# Altium PCB PCI Express Mini L1.PCBDOC (part 3 of 7)
Units mm, origin at the board's own origin, x right, y up, seen from the top; angles counter-clockwise.
Board outline 70 x 83.2 mm, 6 copper layers (TopLayer, Layer 1, Layer 2, Layer 3, Layer 4, Bottom Layer), stack 0.914 mm thick; 402 components, 242 nets, 1301 pads, 522 vias.
Unrouted connection lines stored in the file: 225.
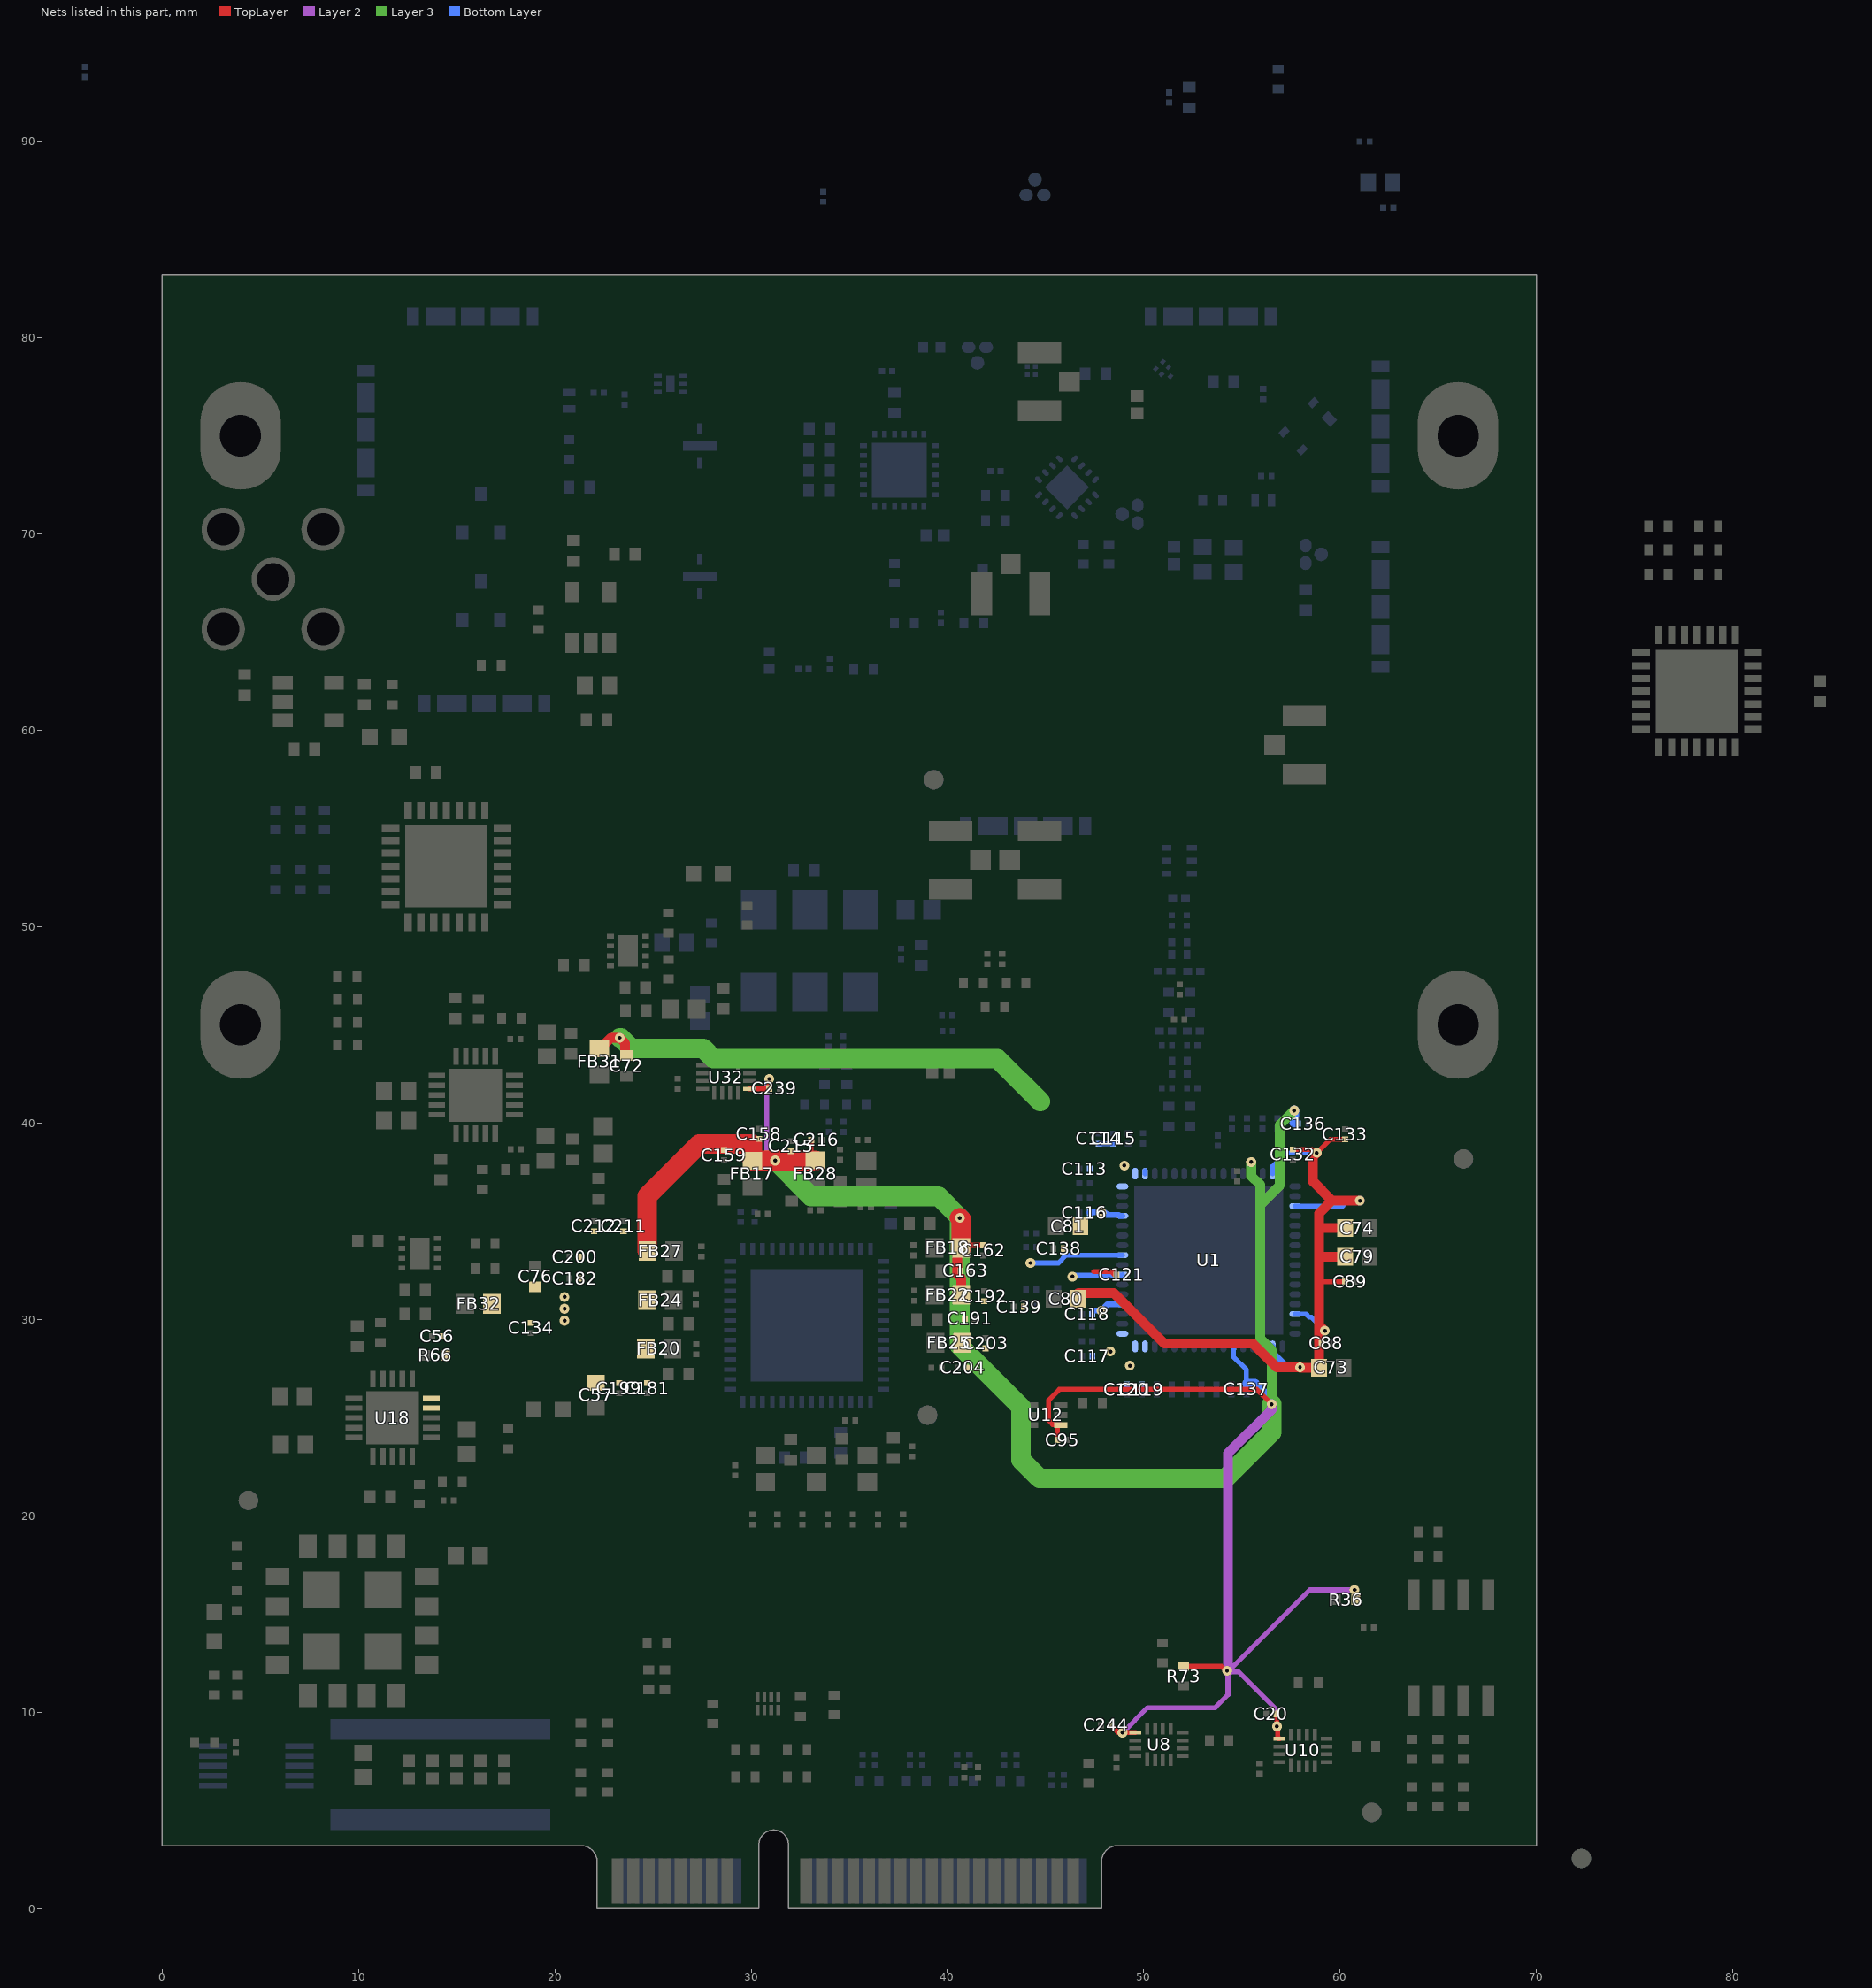
[diagram p6: the nets of this part, all layers, seen from the top]

## Part data (continued)
D2: "Diode PIN 180V 1500mA 3-Pin QFN EP T/R", Case/Package=QFN, Manufacturer="Skyworks Solutions", Max Current Rating=1.5A, Max Power Dissipation=2W, Supplier Part Number 1=863-1780-1-ND, Category=Diodes, ComponentLink1Description=http://www.mouser.com/ds/2/472/CLA4611_085LF_203346B-1079479.pdf?src-supplier=Mouser, ComponentLink1URL=http://www.mouser.com/ds/2/472/CLA4611_085LF_203346B-1079479.pdf?src-supplier=Mouser, ComponentLink2Description=http://www.skyworksinc.com/uploads/documents/CLA4611_085LF_203346B.pdf?src-supplier=Digi-Key, ComponentLink2URL=http://www.skyworksinc.com/uploads/documents/CLA4611_085LF_203346B.pdf?src-supplier=Digi-Key, Diode Type="PIN - Single", Manufacturer Part Number=CLA4611-085LF, Packaging="Tape and Reel", Pricing 1="1=2,06000, 10=1,85200, 25=1,74760, 100=1,48890, 250=1,39800, 500=1,22326, 1000=1,01355 (USD)", RoHS=Yes, Stock 1=1259, Supplier 1=Digi-Key
D3 D4 D7 D8: "LED,  LTST-C190GKT", Case Code (Imperial)=0603, Case Code (Metric)=1608, Color=Green, Forward Current=30mA, Forward Voltage=2.1V, Lens Color=Colorless, Manufacturer 1="Vishay Lite-On", Max Operating Temperature=85°C, Min Operating Temperature=-55°C, Package Quantity=1, Power Dissipation=100mW, Reverse Voltage=5V, Supplier Part Number 1=160-1183-1-ND, Test Current=10mA, Voltage=2V, Case/Package=0603, ComponentLink1Description=https://datasheet.ciiva.com/11775/0900766b80dc02a6-11775616.pdf?src-supplier=RSComponents, ComponentLink1URL=https://datasheet.ciiva.com/11775/0900766b80dc02a6-11775616.pdf?src-supplier=RSComponents, ComponentLink2Description=https://datasheet.ciiva.com/2109/ltst-c190gkt-2109985.pdf?src-supplier=Digi-Key, ComponentLink2URL=https://datasheet.ciiva.com/2109/ltst-c190gkt-2109985.pdf?src-supplier=Digi-Key, ComponentLink3Description=https://datasheet.ciiva.com/16392/lite-on20ltst-c190gkt-16392818.pdf?src-supplier=Future+Electronics, ComponentLink3URL=https://datasheet.ciiva.com/16392/lite-on20ltst-c190gkt-16392818.pdf?src-supplier=Future+Electronics, ComponentLink4Description=https://datasheet.ciiva.com/12403/lite-on-ltst-c190gkt-187204-12403884.pdf?src-supplier=Mouser, ComponentLink4URL=https://datasheet.ciiva.com/12403/lite-on-ltst-c190gkt-187204-12403884.pdf?src-supplier=Mouser, ComponentLink5Description=https://datasheet.ciiva.com/2109/ltst-c190gkt-2109986.pdf?src-supplier=Digi-Key, ComponentLink5URL=https://datasheet.ciiva.com/2109/ltst-c190gkt-2109986.pdf?src-supplier=Digi-Key, ComponentLink6Description=https://datasheet.ciiva.com/2109/ltst-c190gkt-2109987.pdf?src-supplier=Digi-Key, ComponentLink6URL=https://datasheet.ciiva.com/2109/ltst-c190gkt-2109987.pdf?src-supplier=Digi-Key, Depth=0.8mm, Dominant Wavelength=569nm, Height=0.8mm, Illumination Color=Green, Lead Free="Lead Free", Length=1.6mm, Lens Style=Clear,Diffused,Colorless,Rectangular, Lens Transparency=Clear, Luminous Intensity=6mcd, Manufacturer Part Number 1=LTST-C190GKT, Mount="Surface Mount", Number of Elements=1, Number of LEDs=1, Number of Pins=2, Packaging="Tape and Reel", Power Rating=100mW, Pricing 1="1=0.26000, 10=0.18800, 100=0.08880, 500=0.05922, 1000=0.04639 (USD)", Radiation Hardening=No, RoHS=Yes, Stock 1=908158, Supplier 1=Digi-Key, Viewing Angle=130°, Wavelength=565nm, Width=0.8mm
D5: "DIODE RF PIN 45V 1.5A 3QFN", Case/Package=QFN, Forward Current=1.5A, Manufacturer="Skyworks Solutions", Max Operating Temperature=150°C, Max Power Dissipation=2W, Min Operating Temperature=-40°C, Package Quantity=3000, Power Dissipation=30W, Reverse Voltage (DC)=45V, Supplier Part Number 1=863-1400-1-ND, Category=Diodes, ComponentLink1Description=https://datasheet.ciiva.com/15224/getdatasheetpartid-729048-15224693.pdf?src-supplier=Verical, ComponentLink1URL=https://datasheet.ciiva.com/15224/getdatasheetpartid-729048-15224693.pdf?src-supplier=Verical, Diode Type="PIN - Single", Element Configuration="Common Anode", Lead Free="Lead Free", Manufacturer Part Number=CLA4603-085LF, Max Current Rating=1.5A, Mount="Surface Mount", Number of Pins=3, Packaging="Tape and Reel", Pricing 1="1=2,06000, 10=1,85200, 25=1,74760, 100=1,48890, 250=1,39800, 500=1,22326, 1000=1,01355 (USD)", Radiation Hardening=No, RoHS=Yes, Stock 1=32861, Supplier 1=Digi-Key, Termination=SMD/SMT
FB1 FB2 FB3: library part Ferrite, Case Code (Imperial)=0402, Case Code (Metric)=1005, Current Rating=300mA, DC Resistance (DCR)=550mR, Frequency=100MHz, Manufacturer 1=Murata, Manufacturer Part Number 1=BLM15BB121SN1D, Max Operating Temperature=125°C, Min Operating Temperature=-55°C, Package Quantity=1, Supplier Part Number 1=490-1008-1-ND, Tolerance=25%, Case/Package=0402, ComponentLink1Description=https://datasheet.ciiva.com/1466/5145-1466832.pdf?src-supplier=Element14, ComponentLink1URL=https://datasheet.ciiva.com/1466/5145-1466832.pdf?src-supplier=Element14, ComponentLink2Description=https://datasheet.ciiva.com/41449/001172179-da-01-en-drossel-0402-120r-1-0x0-5mm-10000st-41449466.pdf?src-supplier=Conrad, ComponentLink2URL=https://datasheet.ciiva.com/41449/001172179-da-01-en-drossel-0402-120r-1-0x0-5mm-10000st-41449466.pdf?src-supplier=Conrad, ComponentLink3Description=https://datasheet.ciiva.com/1466/5145-1466833.pdf?src-supplier=Element14, ComponentLink3URL=https://datasheet.ciiva.com/1466/5145-1466833.pdf?src-supplier=Element14, ComponentLink4Description=https://datasheet.ciiva.com/3082/l0110s0100blm15b-3082680.pdf?src-supplier=Avnet, ComponentLink4URL=https://datasheet.ciiva.com/3082/l0110s0100blm15b-3082680.pdf?src-supplier=Avnet, ComponentLink5Description=https://datasheet.ciiva.com/16213/l0110s0100blm15b-16213674.pdf?src-supplier=Future+Electronics, ComponentLink5URL=https://datasheet.ciiva.com/16213/l0110s0100blm15b-16213674.pdf?src-supplier=Future+Electronics, ComponentLink6Description=https://datasheet.ciiva.com/1012/l0110s0100blm15b-1012029.pdf?src-supplier=Digi-Key, ComponentLink6URL=https://datasheet.ciiva.com/1012/l0110s0100blm15b-1012029.pdf?src-supplier=Digi-Key, ComponentLink7Description=https://datasheet.ciiva.com/1012/l0110s0100blm15b-1012030.pdf?src-supplier=Digi-Key, ComponentLink7URL=https://datasheet.ciiva.com/1012/l0110s0100blm15b-1012030.pdf?src-supplier=Digi-Key, ComponentLink8Description=https://datasheet.ciiva.com/1012/l0110s0100blm15b-1012031.pdf?src-supplier=Digi-Key, ComponentLink8URL=https://datasheet.ciiva.com/1012/l0110s0100blm15b-1012031.pdf?src-supplier=Digi-Key, Composition="Ferrite Bead", Core Material=Ferrite, Depth=0.5mm, Height=0.5mm, Impedance=120R, Lead Free="Lead Free", Length=1mm, Material=Ferrite,Steel, Max Current Rating=300mA, Max DC Current=300mA, Number of Circuits=1, Number of Lines=1, Number of Pins=2, Packaging="Tape and Reel", Pricing 1="1=0.10000, 10=0.08300, 25=0.07440, 50=0.05440, 100=0.04700, 250=0.03712, 500=0.03136, 1000=0.02640, 5000=0.02351 (USD)", REACH SVHC="No SVHC", RoHS=Yes, Shielding=Unshielded, Stock 1=178432, Supplier 1=Digi-Key, Termination=SMD/SMT, Test Frequency=100MHz, Width=0.5mm
FB4 FB7 FB29 FB31 FB32: library part Ferrite, Case Code (Imperial)=0603, Case Code (Metric)=1608, Current Rating=2A, DC Resistance (DCR)=45mR, Manufacturer 1=TDK, Manufacturer Part Number 1=MPZ1608S121ATAH0, Package Quantity=4000, Supplier Part Number 1=445-5219-1-ND, Tolerance=25%, Case/Package=0603, ComponentLink1Description=https://datasheet.ciiva.com/46634/beads-commercial-power-mpz-en-46634726.pdf?src-supplier=Digi-Key, ComponentLink1URL=https://datasheet.ciiva.com/46634/beads-commercial-power-mpz-en-46634726.pdf?src-supplier=Digi-Key, ComponentLink2Description=https://datasheet.ciiva.com/46634/beads-commercial-power-mpz-en-46634728.pdf?src-supplier=Digi-Key, ComponentLink2URL=https://datasheet.ciiva.com/46634/beads-commercial-power-mpz-en-46634728.pdf?src-supplier=Digi-Key, ComponentLink3Description=https://datasheet.ciiva.com/48682/beads-commercial-power-mpz-en-48682494.pdf?src-supplier=Avnet, ComponentLink3URL=https://datasheet.ciiva.com/48682/beads-commercial-power-mpz-en-48682494.pdf?src-supplier=Avnet, Core Material=Ferrite, Depth=0.8mm, Height=0.03inch, Impedance=120R, Length=0.063inch, Max DC Current=2A, Mount="Surface Mount", Packaging="Tape and Reel", Pricing 1="1=0.10000, 10=0.07900, 25=0.07160, 50=0.06440, 100=0.04720, 250=0.03432, 500=0.03146, 1000=0.02717 (USD)", RoHS=Yes, Stock 1=68096, Supplier 1=Digi-Key, Width=0.031inch
FB5 FB6 FB11 FB13 FB14 FB30: library part Ferrite, Case Code (Imperial)=0402, Case Code (Metric)=1005, Current Rating=1.74A, DC Resistance (DCR)=15mR, Manufacturer 1=Murata, Manufacturer Part Number 1=BLM15AX100SN1D, Max Operating Temperature=125°C, Min Operating Temperature=-55°C, Package Quantity=1, Supplier Part Number 1=490-5437-1-ND, Test Frequency=100MHz, Tolerance=25%, Case/Package=0402, ComponentLink1Description=https://datasheet.ciiva.com/41449/001172165-da-01-en-drossel-0402-10r0-1-0x0-5mm-10000st-41449453.pdf?src-supplier=Conrad, ComponentLink1URL=https://datasheet.ciiva.com/41449/001172165-da-01-en-drossel-0402-10r0-1-0x0-5mm-10000st-41449453.pdf?src-supplier=Conrad, ComponentLink2Description=https://datasheet.ciiva.com/1012/l0110e-1012384.pdf?src-supplier=Digi-Key, ComponentLink2URL=https://datasheet.ciiva.com/1012/l0110e-1012384.pdf?src-supplier=Digi-Key, ComponentLink3Description=https://datasheet.ciiva.com/1012/l0110e-1012385.pdf?src-supplier=Digi-Key, ComponentLink3URL=https://datasheet.ciiva.com/1012/l0110e-1012385.pdf?src-supplier=Digi-Key, ComponentLink4Description=https://datasheet.ciiva.com/1012/l0110e-1012383.pdf?src-supplier=Digi-Key, ComponentLink4URL=https://datasheet.ciiva.com/1012/l0110e-1012383.pdf?src-supplier=Digi-Key, Depth=0.5mm, Height=0.5mm, Impedance=10R, Lead Free="Lead Free", Length=1mm, Material=Ferrite,Steel, Max Current Rating=1.74A, Max DC Current=1.74A, Number of Circuits=1, Number of Lines=1, Number of Pins=2, Packaging="Tape and Reel", Pricing 1="1=0.11000, 10=0.09000, 25=0.08120, 50=0.05960, 100=0.05140, 250=0.04060, 500=0.03428, 1000=0.02886, 5000=0.02571 (USD)", REACH SVHC="No SVHC", RoHS=Yes, Stock 1=154406, Supplier 1=Digi-Key, Termination=SMD/SMT, Width=0.5mm
FB15 FB16 FB17 FB18 FB19 FB20 FB22 FB23 FB24 FB25 FB26 FB27 FB28: library part Ferrite, Case Code (Imperial)=0603, Case Code (Metric)=1608, Current Rating=2.5A, DC Resistance (DCR)=50mR, Manufacturer 1=Samsung, Manufacturer Part Number 1=CIS10P221NC, Max Operating Temperature=125°C, Min Operating Temperature=-55°C, Package Quantity=1, Supplier Part Number 1=1276-6350-2-ND, Tolerance=25%, Case/Package=0603, ComponentLink1Description=https://datasheet.ciiva.com/29994/cis10p101ac-29994155.pdf?src-supplier=Avnet, ComponentLink1URL=https://datasheet.ciiva.com/29994/cis10p101ac-29994155.pdf?src-supplier=Avnet, ComponentLink2Description=https://datasheet.ciiva.com/16395/cic21-series-16395893.pdf?src-supplier=Future+Electronics, ComponentLink2URL=https://datasheet.ciiva.com/16395/cic21-series-16395893.pdf?src-supplier=Future+Electronics, Core Material=Ferrite, Depth=0.8mm, Height=0.037inch, Impedance=220R, Lead Free="Lead Free", Length=0.063inch, Max Current Rating=2.5A, Max DC Current=2.5A, Mount="Surface Mount", Number of Lines=1, Packaging="Cut Tape", Pricing 1="4000=0.00880, 8000=0.00660, 12000=0.00638, 28000=0.00616, 100000=0.00572 (USD)", Radiation Hardening=No, RoHS=Yes, Stock 1=336000, Supplier 1=Digi-Key, Width=0.031inch
FID1 FID2 FID3 FID4 FID5 FID6: library part Fid
FL1: "SAW Filter 1582.470MHz", Center Frequency="1582.47 MHz", Maximum Input Power="15 dBm", ComponentLink1Description=Datasheet, ComponentLink1URL=https://www.golledge.com/media/2798/mp07322.pdf, Zl="50 Ohm", Zs="50 Ohm"
H1 H2 H3 H4 H5 H6 H7: library part 36900000, "WE-SHC Shielding Cabinet, Clip, 6.5x0.8x1.27mm", Manufacturer="Wurth Elektronik", Operating Temperature="-40 to +125degC", Base Material=Steel, ComponentLink1Description=Manufacturer, ComponentLink1URL=http://www.we-online.de, ComponentLink2Description=Datasheet, ComponentLink2URL=https://www.we-online.com/catalog/datasheet/36900000.pdf, Height=1.27mm, Length=6.5mm, Manufacturer Part Number=36900000, Mounting Technology=SMT, Packaging="Tape and Reel", Plating=Tin, Published Date="April 2020", Type=Clip, Width=0.8mm
J1 J7 J8 J10 J11: "Ultra Miniature Coaxial Connector Jack, 60 V, 50 Ohm, -40 to 90 degC, RoHS, Tape and Reel", Maximum Frequency="6 GHz", Operating Temperature Range="- 40 C to + 90 C", Supplier Part Number 1=62X0488, Body Material="Liquid Crystal Polymer (LCP)", Brand="TE Connectivity / AMP", ComponentLink1Description="Manufacturer URL", ComponentLink1URL=http://www.te.com, ComponentLink2Description=Datasheet, ComponentLink2URL=http://www.te.com/commerce/DocumentDelivery/DDEController?Action=srchrtrv&DocNm=1909763&DocType=Customer+Drawing&DocLang=English, Contact Material="Copper Alloy", Contact Plating=Gold, DatasheetVersion="Rev. B2", Factory Pack Quantity=5000, Gender="Jack (Female)", Impedance="50 Ohms", Mounting Technology="Surface Mount", Orientation=Straight, PackageDescription="3-Pin Surface Mount Device, Body 2.6 x 2.6 mm", PackageReference=SMD, Packaging=Reel, Product=Connectors, Product Category="RF Connectors / Coaxial Connectors", RF Series=UMCC, RoHS=Details, Supplier 1=Newark, Supplier 2=Farnell, Supplier 3=Digi-Key, Supplier 4=Digi-Key, Supplier 5=Digi-Key, Supplier Part Number 2=2781689, Supplier Part Number 3=A118077TR-ND, Supplier Part Number 4=A118077CT-ND, Supplier Part Number 5=A118077DKR-ND
J2: "SMA Straight Jack, Up to 18 GHz, -55 to 155 degC", Manufacturer="Adam Equipment", Manufacturer Part Number=RF2-04A-T-00-50-G, Supplier Part Number 1=2057-RF2-04A-T-00-50-G-ND, Pricing 1="1=1,29000, 10=1,13300, 25=1,06640, 50=1,02220, 100=0,97770, 250=0,88880, 500=0,79992, 1000=0,71104, 2500=0,64438 (USD)", RoHS=No, Stock 1=1170, Supplier 1=Digi-Key
L1: library part IND_WW, Case Code (Imperial)=0402, Case Code (Metric)=1005, Current Rating=540mA, DC Resistance (DCR)=140mR, Manufacturer 1=Murata, Manufacturer Part Number 1=LQW15AN8N2J00D, Max Operating Temperature=125°C, Min Operating Temperature=-55°C, Package Quantity=1, Self Resonant Frequency=5.5GHz, Supplier Part Number 1=490-1144-1-ND, Test Frequency=100MHz, Tolerance=5%, Case/Package=0402, ComponentLink1Description=https://datasheet.ciiva.com/11799/0900766b8090d800-11799046.pdf?src-supplier=RSComponents, ComponentLink1URL=https://datasheet.ciiva.com/11799/0900766b8090d800-11799046.pdf?src-supplier=RSComponents, ComponentLink2Description=https://datasheet.ciiva.com/1042/l0075s0080lqw15a-00-1042176.pdf?src-supplier=Digi-Key, ComponentLink2URL=https://datasheet.ciiva.com/1042/l0075s0080lqw15a-00-1042176.pdf?src-supplier=Digi-Key, ComponentLink3Description=https://datasheet.ciiva.com/17278/l0075s0080lqw15a-00-17278345.pdf?src-supplier=Avnet+Europe, ComponentLink3URL=https://datasheet.ciiva.com/17278/l0075s0080lqw15a-00-17278345.pdf?src-supplier=Avnet+Europe, ComponentLink4Description=https://datasheet.ciiva.com/8506/l0075s0080lqw15a-00-8506028.pdf?src-supplier=Avnet, ComponentLink4URL=https://datasheet.ciiva.com/8506/l0075s0080lqw15a-00-8506028.pdf?src-supplier=Avnet, ComponentLink5Description=https://datasheet.ciiva.com/1042/l0075s0080lqw15a-00-1042174.pdf?src-supplier=Digi-Key, ComponentLink5URL=https://datasheet.ciiva.com/1042/l0075s0080lqw15a-00-1042174.pdf?src-supplier=Digi-Key, ComponentLink6Description=https://datasheet.ciiva.com/1042/l0075s0080lqw15a-00-1042175.pdf?src-supplier=Digi-Key, ComponentLink6URL=https://datasheet.ciiva.com/1042/l0075s0080lqw15a-00-1042175.pdf?src-supplier=Digi-Key, Core Material=Air,Ferrite, DC Current=540mA, Depth=0.7mm, Height=0.5mm, Inductance=8.2nH, Lead Free="Lead Free", Length=1mm, Max DC Current=540mA, Military Standard=Not, Mount="Surface Mount", Packaging="Tape and Reel", Pricing 1="1=0.17000, 10=0.15500, 100=0.10350, 500=0.08626, 1000=0.07245, 2500=0.06210 (USD)", Q Factor=25, Radiation Hardening=No, RoHS=Yes, Shielding=Unshielded, Stock 1=37106, Supplier 1=Digi-Key, Termination=SMD/SMT, Weight=2.8E-05oz, Width=0.02inch
L2: library part 744765027A, "WE-KI SMT Wire Wound Ceramic Inductor, size 0402, 2.7nH, 0.64A", DC Resistance max.=0.12Ohm, Inductance=2.7nH, Inductance Tolerance=+/-0.2nH, Manufacturer="Wurth Elektronik", Operating Temperature="-40 to +125degC", Rated Current=0.64A, Self Resonant Frequency=6000MHz, ComponentLink1Description=Manufacturer, ComponentLink1URL=http://www.we-online.de, ComponentLink2Description=Datasheet, ComponentLink2URL=https://www.we-online.com/catalog/datasheet/744765027A.pdf, Manufacturer Part Number=744765027A, Mounting Technology=SMT, Packaging="Tape and Reel", Published Date="April 2020", Q-Factor min.=16, Size=0402
L3: library part 744765120A, "WE-KI SMT Wire Wound Ceramic Inductor, size 0402, 20nH, 0.42A", DC Resistance max.=0.25Ohm, Inductance=20nH, Inductance Tolerance=+/-5%, Manufacturer="Wurth Elektronik", Operating Temperature="-40 to +125degC", Rated Current=0.42A, Self Resonant Frequency=3000MHz, ComponentLink1Description=Manufacturer, ComponentLink1URL=http://www.we-online.de, ComponentLink2Description=Datasheet, ComponentLink2URL=https://www.we-online.com/catalog/datasheet/744765120A.pdf, Manufacturer Part Number=744765120A, Mounting Technology=SMT, Packaging="Tape and Reel", Published Date="April 2020", Q-Factor min.=25, Size=0402
L4: library part IND_WW, "Inductor Chip 43nH 5% 2-Pin 0402 Paper T/R", Manufacturer=Murata, Manufacturer Part Number=LQG15WZ43NJ02D, Supplier Part Number 1=490-LQG15WZ43NJ02DCT-ND, ComponentLink1Description=http://datasheet.octopart.com/LQG15WZ43NJ02D-Murata-datasheet-138753957.pdf?src-supplier=Ciiva+Crawler, ComponentLink1URL=http://datasheet.octopart.com/LQG15WZ43NJ02D-Murata-datasheet-138753957.pdf?src-supplier=Ciiva+Crawler, ComponentLink2Description=http://datasheet.octopart.com/LQG15WZ43NJ02D-Murata-datasheet-140712826.pdf?src-supplier=Ciiva+Crawler, ComponentLink2URL=http://datasheet.octopart.com/LQG15WZ43NJ02D-Murata-datasheet-140712826.pdf?src-supplier=Ciiva+Crawler, ComponentLink3Description=http://datasheet.octopart.com/LQG15WZ43NJ02D-Murata-datasheet-141286732.pdf?src-supplier=Ciiva+Crawler, ComponentLink3URL=http://datasheet.octopart.com/LQG15WZ43NJ02D-Murata-datasheet-141286732.pdf?src-supplier=Ciiva+Crawler, ComponentLink4Description=http://datasheet.octopart.com/LQG15WZ43NJ02D-Murata-datasheet-145449678.pdf?src-supplier=Geoflip, ComponentLink4URL=http://datasheet.octopart.com/LQG15WZ43NJ02D-Murata-datasheet-145449678.pdf?src-supplier=Geoflip, Pricing 1="1=0,13000, 10=0,11700, 25=0,10400, 50=0,08840, 100=0,07800, 250=0,07152, 500=0,06500, 1000=0,05460, 2500=0,04680 (USD)", Stock 1=10000, Supplier 1=Digi-Key
P1: library part CMP-0001-00067-2, "Golden finger, PCIeMini, Dual, Staggered, Pitch 0.8mm, 52-Position", Package Reference=PCIeMini-GF-2D-800-1K-S52, Package Version="rev1.2, Oct-2007", ClassName="Edge Connector", Datasheet Version="Revision 1.2 Oct-2007", Mating Connector=Tyco-292443-1, Publisher=Altium
R1 R3 R6 R8 R10 R12: library part Resistor, Case Code (Imperial)=0201, Case Code (Metric)=0603, Manufacturer 1=Panasonic, Manufacturer Part Number 1=ERJ-1GNF10R0C, Max Operating Temperature=125°C, Max Power Dissipation=50mW, Min Operating Temperature=-55°C, Package Quantity=15000, Supplier Part Number 1=2396827, Temperature Coefficient=200ppm/°C, Tolerance=1%, Voltage Rating=25V, Case/Package=0201, ComponentLink1Description=https://datasheet.ciiva.com/17212/aoa0000ce2-17212053.pdf?src-supplier=Avnet+Europe, ComponentLink1URL=https://datasheet.ciiva.com/17212/aoa0000ce2-17212053.pdf?src-supplier=Avnet+Europe, ComponentLink2Description=https://datasheet.ciiva.com/9194/aoa0000ce2-9194214.pdf?src-supplier=Avnet, ComponentLink2URL=https://datasheet.ciiva.com/9194/aoa0000ce2-9194214.pdf?src-supplier=Avnet, ComponentLink3Description=https://datasheet.ciiva.com/16201/aoa0000ce2-16201496.pdf?src-supplier=Future+Electronics, ComponentLink3URL=https://datasheet.ciiva.com/16201/aoa0000ce2-16201496.pdf?src-supplier=Future+Electronics, ComponentLink4Description=https://datasheet.ciiva.com/16511/aoa0000ce2-16511388.pdf?src-supplier=Avnet+Asia, ComponentLink4URL=https://datasheet.ciiva.com/16511/aoa0000ce2-16511388.pdf?src-supplier=Avnet+Asia, ComponentLink5Description=https://datasheet.ciiva.com/43467/1678782-43467006.pdf?src-supplier=Farnell, ComponentLink5URL=https://datasheet.ciiva.com/43467/1678782-43467006.pdf?src-supplier=Farnell, ComponentLink6Description=https://datasheet.ciiva.com/24161/aoa0000ce2-24161967.pdf?src-supplier=Mouser, ComponentLink6URL=https://datasheet.ciiva.com/24161/aoa0000ce2-24161967.pdf?src-supplier=Mouser, Composition="Thick Film", Contact Plating=Tin,Matte, Height=0.01inch, Lead Free="Lead Free", Length=0.6mm, Mount="Surface Mount", Number of Pins=2, Number of Terminations=2, Packaging="Tape and Reel", Power Rating=50mW, Radiation Hardening=No, REACH SVHC="No SVHC", Resistance=10R, RoHS=Yes, Stock 1=135000, Supplier 1=Farnell, Termination=SMD/SMT, Voltage Rating (DC)=25V, Weight=6E-06oz, Width=0.012inch, Working Voltage=25V
R2 R4 R11 R13 R25 R26 R28 R35 R45 R47 R50 R51 R62 R70 R71 R74 R75 R89 R90 R91 R94 R96 R119 R129 R130: library part Resistor, Case Code (Imperial)=0402, Case Code (Metric)=1005, Manufacturer 1=Yageo, Manufacturer Part Number 1=RC0402JR-070RL, Max Operating Temperature=155°C, Max Power Dissipation=63mW, Min Operating Temperature=-55°C, Package Quantity=1, Power Rating=62.5mW, Supplier Part Number 1=311-0.0JRCT-ND, Temperature Coefficient=200ppm/°C, Tolerance=5%, Voltage Rating=50V, Case/Package=0402, ComponentLink1Description=https://datasheet.ciiva.com/2452/pyu-rc0402-51-rohs-l-6-2452608.pdf?src-supplier=Digi-Key, ComponentLink1URL=https://datasheet.ciiva.com/2452/pyu-rc0402-51-rohs-l-6-2452608.pdf?src-supplier=Digi-Key, ComponentLink2Description=https://datasheet.ciiva.com/11808/0900766b80c66297-11808195.pdf?src-supplier=RSComponents, ComponentLink2URL=https://datasheet.ciiva.com/11808/0900766b80c66297-11808195.pdf?src-supplier=RSComponents, ComponentLink3Description=https://datasheet.ciiva.com/2452/pyu-r-int-thick-7-2452609.pdf?src-supplier=Digi-Key, ComponentLink3URL=https://datasheet.ciiva.com/2452/pyu-r-int-thick-7-2452609.pdf?src-supplier=Digi-Key, ComponentLink4Description=https://datasheet.ciiva.com/22747/1018594-22747515.pdf?src-supplier=Element14, ComponentLink4URL=https://datasheet.ciiva.com/22747/1018594-22747515.pdf?src-supplier=Element14, ComponentLink5Description=https://datasheet.ciiva.com/7983/1018594-7983535.pdf?src-supplier=Element14, ComponentLink5URL=https://datasheet.ciiva.com/7983/1018594-7983535.pdf?src-supplier=Element14, ComponentLink6Description=https://datasheet.ciiva.com/2452/pyu-r-int-thick-7-2452610.pdf?src-supplier=Digi-Key, ComponentLink6URL=https://datasheet.ciiva.com/2452/pyu-r-int-thick-7-2452610.pdf?src-supplier=Digi-Key, ComponentLink7Description=https://datasheet.ciiva.com/8896/pyu-rc0402-51-rohs-l-6-8896201.pdf?src-supplier=Avnet, ComponentLink7URL=https://datasheet.ciiva.com/8896/pyu-rc0402-51-rohs-l-6-8896201.pdf?src-supplier=Avnet, ComponentLink8Description=https://datasheet.ciiva.com/28386/pyu-rc0402-51-rohs-l-6-28386633.pdf?src-supplier=Avnet+Europe, ComponentLink8URL=https://datasheet.ciiva.com/28386/pyu-rc0402-51-rohs-l-6-28386633.pdf?src-supplier=Avnet+Europe, ComponentLink9Description=https://datasheet.ciiva.com/15189/getdatasheetpartid-326379-15189533.pdf?src-supplier=Verical, ComponentLink9URL=https://datasheet.ciiva.com/15189/getdatasheetpartid-326379-15189533.pdf?src-supplier=Verical, Composition="Thick Film", Contact Plating=Tin,Matte, Depth=0.5mm, Features="Moisture Resistant", Height=0.016inch, Lead Free="Lead Free", Length=1mm, Military Standard=Not, Number of Terminations=2, Packaging="Tape and Reel", Pricing 1="1=0.10000, 10=0.01200, 25=0.00920, 50=0.00680, 100=0.00510, 250=0.00388, 500=0.00308, 1000=0.00227, 5000=0.00163 (USD)", Radiation Hardening=No, REACH SVHC=Unknown, Resistance=0mR, RoHS=Yes, Supplier 1=Digi-Key, Termination=SMD/SMT, Width=0.02inch
  R2 R4 R11 R13 R25 R26 R28 R35 R45 R47 R62 R70 R71 R74 R75 R89 R90 R91 R94 R96 R119 R129 R130: Stock 1=69822252
  R50 R51: Stock 1=71594280
R5 R7 R9: library part Resistor, Case Code (Imperial)=0201, Case Code (Metric)=0603, Manufacturer 1=Panasonic, Manufacturer Part Number 1=ERJ-1GNF49R9C, Max Operating Temperature=125°C, Max Power Dissipation=50mW, Min Operating Temperature=-55°C, Package Quantity=15000, Supplier Part Number 1=P123049CT-ND, Temperature Coefficient=200ppm/°C, Tolerance=1%, Voltage Rating=25V, Case/Package=0201, ComponentLink1Description=https://datasheet.ciiva.com/24033/aoa0000ce2-24033580.pdf?src-supplier=Mouser, ComponentLink1URL=https://datasheet.ciiva.com/24033/aoa0000ce2-24033580.pdf?src-supplier=Mouser, ComponentLink2Description=https://datasheet.ciiva.com/16201/aoa0000ce2-16201389.pdf?src-supplier=Future+Electronics, ComponentLink2URL=https://datasheet.ciiva.com/16201/aoa0000ce2-16201389.pdf?src-supplier=Future+Electronics, Composition="Thick Film", Contact Plating=Tin,Matte, Height=0.01inch, Lead Free="Lead Free", Length=0.6mm, Mount="Surface Mount", Number of Terminations=2, Packaging="Tape and Reel", Power Rating=50mW, Pricing 1="1=0.10000, 10=0.05500, 100=0.02240, 1000=0.01007, 2500=0.00874, 5000=0.00722 (USD)", Radiation Hardening=No, Resistance=49.9R, RoHS=Yes, Stock 1=47286, Supplier 1=Digi-Key, Width=0.3mm, Working Voltage=25V
R14: library part Resistor, Case Code (Imperial)=0201, Case Code (Metric)=0603, Manufacturer 1=Panasonic, Manufacturer Part Number 1=ERJ-1GEF1000C, Max Operating Temperature=125°C, Max Power Dissipation=50mW, Min Operating Temperature=-55°C, Package Quantity=15000, Supplier Part Number 1=667-ERJ-1GEF1000C, Temperature Coefficient=200ppm/°C, Tolerance=1%, Voltage Rating=25V, Voltage Rating (DC)=15V, Case/Package=0201, ComponentLink1Description=https://datasheet.ciiva.com/16427/erj-1gef1000c-16427637.pdf?src-supplier=Future+Electronics, ComponentLink1URL=https://datasheet.ciiva.com/16427/erj-1gef1000c-16427637.pdf?src-supplier=Future+Electronics, ComponentLink2Description=https://datasheet.ciiva.com/16766/70260683-16766261.pdf?src-supplier=Allied+Electronics, ComponentLink2URL=https://datasheet.ciiva.com/16766/70260683-16766261.pdf?src-supplier=Allied+Electronics, ComponentLink3Description=https://datasheet.ciiva.com/16776/70260683-16776517.pdf?src-supplier=Allied+Electronics, ComponentLink3URL=https://datasheet.ciiva.com/16776/70260683-16776517.pdf?src-supplier=Allied+Electronics, ComponentLink4Description=https://datasheet.ciiva.com/7830/1678796-7830951.pdf?src-supplier=Element14, ComponentLink4URL=https://datasheet.ciiva.com/7830/1678796-7830951.pdf?src-supplier=Element14, Composition="Thick Film", Contact Plating=Tin, Depth=0.3mm, Height=0.23mm, Lead Free="Lead Free", Length=0.6mm, Military Standard=Not, Mount="Surface Mount", Number of Terminations=2, Packaging="Tape and Reel", Power Rating=50mW, Pricing 1="1=0.10000, 10=0.03100, 100=0.01400, 1000=0.01000, 5000=0.00700, 10000=0.00600 (USD)", REACH SVHC=Unknown, Resistance=100R, RoHS=Yes, Stock 1=517, Supplier 1=Mouser, Termination=SMD/SMT, Width=0.012inch
R15: "RES SMD 5 MOHM 5W 4320 WIDE", Case/Package=Metal, Manufacturer=Ohmite, Max Operating Temperature=155°C, Max Power Dissipation=5W, Min Operating Temperature=-55°C, Package Quantity=1, Resistance=5mR, Supplier Part Number 1=FCSL110R005FERCT-ND, Temperature Coefficient=50ppm/°C, Tolerance=1%, ComponentLink1Description=https://datasheet.ciiva.com/2484/res-fcsl-2484643.pdf?src-supplier=Digi-Key, ComponentLink1URL=https://datasheet.ciiva.com/2484/res-fcsl-2484643.pdf?src-supplier=Digi-Key, ComponentLink2Description=https://datasheet.ciiva.com/2484/res-fcsl-2484644.pdf?src-supplier=Digi-Key, ComponentLink2URL=https://datasheet.ciiva.com/2484/res-fcsl-2484644.pdf?src-supplier=Digi-Key, ComponentLink3Description=https://datasheet.ciiva.com/2484/res-fcsl-2484645.pdf?src-supplier=Digi-Key, ComponentLink3URL=https://datasheet.ciiva.com/2484/res-fcsl-2484645.pdf?src-supplier=Digi-Key, ComponentLink4Description=https://datasheet.ciiva.com/6181/fcsl-6181333.pdf?src-supplier=Farnell, ComponentLink4URL=https://datasheet.ciiva.com/6181/fcsl-6181333.pdf?src-supplier=Farnell, ComponentLink5Description=https://datasheet.ciiva.com/46422/1812595-46422917.pdf?src-supplier=Element14, ComponentLink5URL=https://datasheet.ciiva.com/46422/1812595-46422917.pdf?src-supplier=Element14, ComponentLink6Description=https://datasheet.ciiva.com/8080/fcsl-8080343.pdf?src-supplier=Element14, ComponentLink6URL=https://datasheet.ciiva.com/8080/fcsl-8080343.pdf?src-supplier=Element14, Composition="Metal Foil", Depth=5mm, Features="Moisture Resistant", Height=0.028inch, Length=0.197inch, Manufacturer Part Number=FCSL110R005FER, Number of Pins=2, Number of Terminations=2, Packaging="Tape and Reel", Power Rating=5W, Pricing 1="1 = 2,79000, 10 = 2,47700, 25 = 2,29720, 50 = 2,16220, 100 = 1,89190, 250 = 1,62164, 500 = 1,35136 (USD)", REACH SVHC=Unknown, RoHS=Yes, Stock 1=3877, Supplier 1=Digi-Key, Termination=SMD/SMT, Width=11mm
R16 R17 R18 R22 R23 R24 R29 R30 R32 R33 R34 R39 R43 R44 R76 R103 R111 R112 R145: library part Resistor, Case Code (Imperial)=0402, Case Code (Metric)=1005, Manufacturer 1=Yageo, Manufacturer Part Number 1=RC0402FR-071KL, Max Operating Temperature=155°C, Min Operating Temperature=-55°C, Power Rating=62.5mW, Supplier Part Number 1=311-1.00KLRCT-ND, Temperature Coefficient=100ppm/°C, Tolerance=1%, Voltage Rating=50V, Case/Package=0402, ComponentLink1Description=https://datasheet.ciiva.com/11819/0900766b80c66297-11819477.pdf?src-supplier=RSComponents, ComponentLink1URL=https://datasheet.ciiva.com/11819/0900766b80c66297-11819477.pdf?src-supplier=RSComponents, ComponentLink2Description=https://datasheet.ciiva.com/12666/pyu-rc0402-51-rohs-l-6-r-12666741.pdf?src-supplier=Mouser, ComponentLink2URL=https://datasheet.ciiva.com/12666/pyu-rc0402-51-rohs-l-6-r-12666741.pdf?src-supplier=Mouser, ComponentLink3Description=https://datasheet.ciiva.com/17063/pyu-rc0402-51-rohs-l-6-r-17063193.pdf?src-supplier=Future+Electronics, ComponentLink3URL=https://datasheet.ciiva.com/17063/pyu-rc0402-51-rohs-l-6-r-17063193.pdf?src-supplier=Future+Electronics, ComponentLink4Description=https://datasheet.ciiva.com/22747/1018594-22747513.pdf?src-supplier=Element14, ComponentLink4URL=https://datasheet.ciiva.com/22747/1018594-22747513.pdf?src-supplier=Element14, ComponentLink5Description=https://datasheet.ciiva.com/7849/1018594-7849869.pdf?src-supplier=Element14, ComponentLink5URL=https://datasheet.ciiva.com/7849/1018594-7849869.pdf?src-supplier=Element14, ComponentLink6Description=https://datasheet.ciiva.com/7983/1018594-7983502.pdf?src-supplier=Element14, ComponentLink6URL=https://datasheet.ciiva.com/7983/1018594-7983502.pdf?src-supplier=Element14, ComponentLink7Description=https://datasheet.ciiva.com/7849/1018594-7849871.pdf?src-supplier=Element14, ComponentLink7URL=https://datasheet.ciiva.com/7849/1018594-7849871.pdf?src-supplier=Element14, Composition="Thick Film", Depth=0.5mm, Height=0.32mm, Lead Free="Lead Free", Length=1mm, Military Standard=Not, Number of Pins=2, Packaging="Tape and Reel", Pricing 1="1=0,10000, 10=0,01600, 100=0,00640, 1000=0,00289, 2500=0,00251, 5000=0,00207 (USD)", REACH SVHC=Unknown, Resistance=1kR, RoHS=Yes, Stock 1=57541929, Supplier 1=Digi-Key, Termination=SMD/SMT, Voltage Rating (DC)=50V, Width=0.5mm
R19: library part Resistor, "RES SMD 75K OHM 0.5% 1/16W 0402", Case Code (Imperial)=0402, Case Code (Metric)=1005, Manufacturer=Panasonic, Manufacturer Part Number=ERA-2AED753X, Max Operating Temperature=155°C, Max Power Dissipation=63mW, Min Operating Temperature=-55°C, Package Quantity=1, Supplier Part Number 1=P75KDECT-ND, Temperature Coefficient=25ppm/°C, Tolerance=0.5%, Voltage Rating=25V, Case/Package=0402, Category="Chip SMD Resistors", ComponentLink1Description=https://datasheet.ciiva.com/9187/aoa0000ce26-9187754.pdf?src-supplier=Avnet, ComponentLink1URL=https://datasheet.ciiva.com/9187/aoa0000ce26-9187754.pdf?src-supplier=Avnet, Composition="Thin Film,Metal Film", Contact Plating=Tin, Features="Automotive AEC-Q200", Height=0.016inch, Lead Free="Lead Free", Length=0.039inch, Mount="Surface Mount", Number of Terminations=2, Packaging="Tape and Reel", Power Rating=63mW, Pricing 1="1=0,21000, 10=0,17900, 100=0,07000, 1000=0,02930, 2500=0,02686, 5000=0,02442 (USD)", Resistance=75kR, RoHS=Yes, Stock 1=67830, Supplier 1=Digi-Key, Width=0.02inch
R20 R100: library part Resistor, "YAGEO - RC0402JR-070RL. - RES, THICK FILM, 0R, 0.0625W, 0402", Case Code (Imperial)=0402, Case Code (Metric)=1005, Manufacturer=Yageo, Manufacturer Part Number=RC0402JR-070RL, Max Operating Temperature=155°C, Max Power Dissipation=63mW, Min Operating Temperature=-55°C, Package Quantity=1, Power Rating=62.5mW, Resistor Type="Thick Film", Supplier Part Number 1=311-0.0JRCT-ND, Temperature Coefficient=200ppm/°C, Tolerance=5%, Voltage Rating=50V, Case/Package=0402, Category="Chip SMD Resistors", ComponentLink1Description=https://datasheet.ciiva.com/2452/pyu-rc0402-51-rohs-l-6-2452608.pdf?src-supplier=Digi-Key, ComponentLink1URL=https://datasheet.ciiva.com/2452/pyu-rc0402-51-rohs-l-6-2452608.pdf?src-supplier=Digi-Key, ComponentLink2Description=https://datasheet.ciiva.com/11808/0900766b80c66297-11808195.pdf?src-supplier=RSComponents, ComponentLink2URL=https://datasheet.ciiva.com/11808/0900766b80c66297-11808195.pdf?src-supplier=RSComponents, ComponentLink3Description=https://datasheet.ciiva.com/2452/pyu-r-int-thick-7-2452609.pdf?src-supplier=Digi-Key, ComponentLink3URL=https://datasheet.ciiva.com/2452/pyu-r-int-thick-7-2452609.pdf?src-supplier=Digi-Key, ComponentLink4Description=https://datasheet.ciiva.com/2452/pyu-r-int-thick-7-2452610.pdf?src-supplier=Digi-Key, ComponentLink4URL=https://datasheet.ciiva.com/2452/pyu-r-int-thick-7-2452610.pdf?src-supplier=Digi-Key, ComponentLink5Description=https://datasheet.ciiva.com/8896/pyu-rc0402-51-rohs-l-6-8896201.pdf?src-supplier=Avnet, ComponentLink5URL=https://datasheet.ciiva.com/8896/pyu-rc0402-51-rohs-l-6-8896201.pdf?src-supplier=Avnet, ComponentLink6Description=https://datasheet.ciiva.com/28386/pyu-rc0402-51-rohs-l-6-28386633.pdf?src-supplier=Avnet+Europe, ComponentLink6URL=https://datasheet.ciiva.com/28386/pyu-rc0402-51-rohs-l-6-28386633.pdf?src-supplier=Avnet+Europe, ComponentLink7Description=https://datasheet.ciiva.com/22747/1018594-22747515.pdf?src-supplier=Element14, ComponentLink7URL=https://datasheet.ciiva.com/22747/1018594-22747515.pdf?src-supplier=Element14, ComponentLink8Description=https://datasheet.ciiva.com/15189/getdatasheetpartid-326379-15189533.pdf?src-supplier=Verical, ComponentLink8URL=https://datasheet.ciiva.com/15189/getdatasheetpartid-326379-15189533.pdf?src-supplier=Verical, Contact Plating=Tin,Matte, Depth=0.5mm, Features="Moisture Resistant", Height=0.016inch, Lead Free="Lead Free", Length=1mm, Military Standard=Not, Number of Terminations=2, Packaging="Tape and Reel", Pricing 1="1=0,10000, 10=0,01200, 25=0,00920, 50=0,00680, 100=0,00510, 250=0,00388, 500=0,00310, 1000=0,00228, 5000=0,00163 (USD)", Radiation Hardening=No, REACH SVHC=Unknown, Resistance=0mR, RoHS=Yes, Stock 1=45338179, Supplier 1=Digi-Key, Termination=SMD/SMT, Width=0.02inch
R21 R27 R48 R54 R69 R72 R73 R83: library part Resistor, Case Code (Imperial)=0402, Case Code (Metric)=1005, Manufacturer 1=Vishay, Manufacturer Part Number 1=CRCW0402-10K0FKED, Max Operating Temperature=155°C, Max Power Dissipation=63mW, Min Operating Temperature=-55°C, Package Quantity=10, Supplier Part Number 1=52K6595, Temperature Coefficient=100ppm/°C, Tolerance=1%, Voltage Rating=50V, Case/Package=0402, ComponentLink1Description=https://datasheet.ciiva.com/11809/0900766b80d98824-11809984.pdf?src-supplier=RSComponents, ComponentLink1URL=https://datasheet.ciiva.com/11809/0900766b80d98824-11809984.pdf?src-supplier=RSComponents, ComponentLink2Description=https://datasheet.ciiva.com/2463/dcrcwe3-2463025.pdf?src-supplier=Digi-Key, ComponentLink2URL=https://datasheet.ciiva.com/2463/dcrcwe3-2463025.pdf?src-supplier=Digi-Key, ComponentLink3Description=https://datasheet.ciiva.com/2463/dcrcwe3-2463026.pdf?src-supplier=Digi-Key, ComponentLink3URL=https://datasheet.ciiva.com/2463/dcrcwe3-2463026.pdf?src-supplier=Digi-Key, ComponentLink4Description=https://datasheet.ciiva.com/2463/dcrcwe3-2463027.pdf?src-supplier=Digi-Key, ComponentLink4URL=https://datasheet.ciiva.com/2463/dcrcwe3-2463027.pdf?src-supplier=Digi-Key, ComponentLink5Description=https://datasheet.ciiva.com/46385/1697337-46385560.pdf?src-supplier=Element14, ComponentLink5URL=https://datasheet.ciiva.com/46385/1697337-46385560.pdf?src-supplier=Element14, ComponentLink6Description=https://datasheet.ciiva.com/3255/dcrcwe3-3255961.pdf?src-supplier=Avnet, ComponentLink6URL=https://datasheet.ciiva.com/3255/dcrcwe3-3255961.pdf?src-supplier=Avnet, ComponentLink7Description=https://datasheet.ciiva.com/3255/dcrcwe3-3255962.pdf?src-supplier=Avnet, ComponentLink7URL=https://datasheet.ciiva.com/3255/dcrcwe3-3255962.pdf?src-supplier=Avnet, ComponentLink8Description=https://datasheet.ciiva.com/5547/dcrcwe3-109170-5547786.pdf?src-supplier=Mouser, ComponentLink8URL=https://datasheet.ciiva.com/5547/dcrcwe3-109170-5547786.pdf?src-supplier=Mouser, ComponentLink9Description=https://datasheet.ciiva.com/26316/fld-crcw-e3-data-en-26316618.pdf?src-supplier=Distrelec, ComponentLink9URL=https://datasheet.ciiva.com/26316/fld-crcw-e3-data-en-26316618.pdf?src-supplier=Distrelec, ComponentLink10Description=https://datasheet.ciiva.com/16208/dcrcwe3-16208525.pdf?src-supplier=Future+Electronics, ComponentLink10URL=https://datasheet.ciiva.com/16208/dcrcwe3-16208525.pdf?src-supplier=Future+Electronics, ComponentLink11Description=https://datasheet.ciiva.com/36856/1720486-36856909.pdf?src-supplier=Element14, ComponentLink11URL=https://datasheet.ciiva.com/36856/1720486-36856909.pdf?src-supplier=Element14, Composition="Thick Film", Contact Plating=Tin, Depth=0.5mm, Features="Automotive AEC-Q200", Height=0.35mm, Lead Free="Lead Free", Length=1mm, Military Standard=Not, Mount="Surface Mount", Number of Pins=2, Number of Terminations=2, Packaging="Tape and Reel", Power Rating=63mW, Radiation Hardening=No, REACH SVHC=Unknown, Resistance=10kR, RoHS=Yes, Stock 1=0, Supplier 1=Newark, Termination=SMD/SMT, Voltage Rating (DC)=50V, Weight=2.3E-05oz, Width=0.02inch
R31: library part Resistor, "RES SMD 68 OHM 5% 1/16W 0402", Case Code (Imperial)=0402, Case Code (Metric)=1005, Manufacturer="Stackpole Electronics", Manufacturer Part Number=RMCF0402JT68R0, Max Operating Temperature=155°C, Max Power Dissipation=63mW, Min Operating Temperature=-55°C, Resistor Type="Thick Film", Supplier Part Number 1=RMCF0402JT68R0CT-ND, Temperature Coefficient=100ppm/°C, Tolerance=5%, Case/Package=0402, Category="Chip SMD Resistors", ComponentLink1Description=https://www.seielect.com/Catalog/SEI-RMCF_RMCP.pdf?src-supplier=Digi-Key, ComponentLink1URL=https://www.seielect.com/Catalog/SEI-RMCF_RMCP.pdf?src-supplier=Digi-Key, ComponentLink2Description=https://www.seielect.com/catalog/SEI-Packaging.pdf?src-supplier=Digi-Key, ComponentLink2URL=https://www.seielect.com/catalog/SEI-Packaging.pdf?src-supplier=Digi-Key, ComponentLink3Description=https://www.seielect.com/catalog/SEI-RMCF_RMCP.pdf?src-supplier=Avnet, ComponentLink3URL=https://www.seielect.com/catalog/SEI-RMCF_RMCP.pdf?src-supplier=Avnet, ComponentLink4Description=http://www.seielect.com/Catalog/Sei-RMC.pdf?src-supplier=Future+Electronics, ComponentLink4URL=http://www.seielect.com/Catalog/Sei-RMC.pdf?src-supplier=Future+Electronics, Contact Plating=Tin,Matte, Features="Automotive AEC-Q200", Height=0.016inch, Lead Free="Lead Free", Length=0.039inch, Mount="Surface Mount", Number of Terminations=2, Packaging="Tape and Reel", Power Rating=63mW, Pricing 1="1=0,10000, 10=0,01100, 100=0,00440, 1000=0,00196, 2500=0,00170, 5000=0,00141 (USD)", Radiation Hardening=No, Resistance=68R, RoHS=Yes, Stock 1=155620, Supplier 1=Digi-Key, Width=0.02inch
R36: library part Resistor, "YAGEO - RC0402FR-0720KL - RES, THICK FILM, 20K, 1%, 0.0625W, 0402", Case Code (Imperial)=0402, Case Code (Metric)=1005, Manufacturer=Yageo, Manufacturer Part Number=RC0402FR-0720KL, Max Operating Temperature=155°C, Max Power Dissipation=63mW, Min Operating Temperature=-55°C, Package Quantity=1, Power Rating=62.5mW, Resistor Type="Thick Film", Supplier Part Number 1=311-20.0KLRCT-ND, Temperature Coefficient=100ppm/°C, Tolerance=1%, Voltage Rating=50V, Case/Package=0402, Category="Chip SMD Resistors", ComponentLink1Description=https://datasheet.ciiva.com/11808/0900766b80c66297-11808454.pdf?src-supplier=RSComponents, ComponentLink1URL=https://datasheet.ciiva.com/11808/0900766b80c66297-11808454.pdf?src-supplier=RSComponents, ComponentLink2Description=https://datasheet.ciiva.com/2453/pyu-r-int-thick-7-2453493.pdf?src-supplier=Digi-Key, ComponentLink2URL=https://datasheet.ciiva.com/2453/pyu-r-int-thick-7-2453493.pdf?src-supplier=Digi-Key, ComponentLink3Description=https://datasheet.ciiva.com/2453/pyu-r-int-thick-7-2453494.pdf?src-supplier=Digi-Key, ComponentLink3URL=https://datasheet.ciiva.com/2453/pyu-r-int-thick-7-2453494.pdf?src-supplier=Digi-Key, ComponentLink4Description=https://datasheet.ciiva.com/2453/pyu-r-int-thick-7-2453495.pdf?src-supplier=Digi-Key, ComponentLink4URL=https://datasheet.ciiva.com/2453/pyu-r-int-thick-7-2453495.pdf?src-supplier=Digi-Key, ComponentLink5Description=https://datasheet.ciiva.com/7983/1018594-7983511.pdf?src-supplier=Element14, ComponentLink5URL=https://datasheet.ciiva.com/7983/1018594-7983511.pdf?src-supplier=Element14, ComponentLink6Description=https://datasheet.ciiva.com/12558/pyu-rc0402-51-rohs-l-6-r-8721-12558796.pdf?src-supplier=Mouser, ComponentLink6URL=https://datasheet.ciiva.com/12558/pyu-rc0402-51-rohs-l-6-r-8721-12558796.pdf?src-supplier=Mouser, ComponentLink7Description=https://datasheet.ciiva.com/46394/1018594-46394974.pdf?src-supplier=Element14, ComponentLink7URL=https://datasheet.ciiva.com/46394/1018594-46394974.pdf?src-supplier=Element14, Depth=0.5mm, Features="Moisture Resistant", Height=0.016inch, Lead Free="Lead Free", Length=1mm, Military Standard=Not, Number of Pins=2, Number of Terminations=2, Packaging="Tape and Reel", Pricing 1="1=0,10000, 10=0,01500, 100=0,00620, 1000=0,00278, 2500=0,00242, 5000=0,00200 (USD)", REACH SVHC="No SVHC", Resistance=20kR, RoHS=Yes, Stock 1=5041118, Supplier 1=Digi-Key, Termination=SMD/SMT, Voltage Rating (DC)=50V, Width=0.02inch
R37 R38 R42 R52: library part Resistor, Case Code (Imperial)=0402, Case Code (Metric)=1005, Manufacturer 1=Yageo, Manufacturer Part Number 1=RC0402FR-07100KL, Max Operating Temperature=155°C, Max Power Dissipation=63mW, Min Operating Temperature=-55°C, Package Quantity=1, Supplier Part Number 1=311-100KLRCT-ND, Temperature Coefficient=100ppm/°C, Tolerance=1%, Voltage Rating=50V, Case/Package=0402, ComponentLink1Description=https://datasheet.ciiva.com/11819/0900766b80c66297-11819452.pdf?src-supplier=RSComponents, ComponentLink1URL=https://datasheet.ciiva.com/11819/0900766b80c66297-11819452.pdf?src-supplier=RSComponents, ComponentLink2Description=https://datasheet.ciiva.com/2453/pyu-r-int-thick-7-2453361.pdf?src-supplier=Digi-Key, ComponentLink2URL=https://datasheet.ciiva.com/2453/pyu-r-int-thick-7-2453361.pdf?src-supplier=Digi-Key, ComponentLink3Description=https://datasheet.ciiva.com/2453/pyu-r-int-thick-7-2453362.pdf?src-supplier=Digi-Key, ComponentLink3URL=https://datasheet.ciiva.com/2453/pyu-r-int-thick-7-2453362.pdf?src-supplier=Digi-Key, ComponentLink4Description=https://datasheet.ciiva.com/2453/pyu-r-int-thick-7-2453363.pdf?src-supplier=Digi-Key, ComponentLink4URL=https://datasheet.ciiva.com/2453/pyu-r-int-thick-7-2453363.pdf?src-supplier=Digi-Key, ComponentLink5Description=https://datasheet.ciiva.com/22747/1018594-22747509.pdf?src-supplier=Element14, ComponentLink5URL=https://datasheet.ciiva.com/22747/1018594-22747509.pdf?src-supplier=Element14, ComponentLink6Description=https://datasheet.ciiva.com/15189/getdatasheetpartid-323696-15189334.pdf?src-supplier=Verical, ComponentLink6URL=https://datasheet.ciiva.com/15189/getdatasheetpartid-323696-15189334.pdf?src-supplier=Verical, ComponentLink7Description=https://datasheet.ciiva.com/12667/pyu-rc0402-51-rohs-l-6-r-12667930.pdf?src-supplier=Mouser, ComponentLink7URL=https://datasheet.ciiva.com/12667/pyu-rc0402-51-rohs-l-6-r-12667930.pdf?src-supplier=Mouser, Composition="Thick Film", Depth=0.5mm, Features="Moisture Resistant", Height=0.016inch, Lead Free="Lead Free", Length=0.039inch, Military Standard=Not, Number of Terminations=2, Packaging="Tape and Reel", Power Rating=63mW, Pricing 1="1=0,10000, 10=0,01500, 100=0,00600, 1000=0,00270, 2500=0,00235, 5000=0,00194 (USD)", REACH SVHC="No SVHC", Resistance=100kR, RoHS=Yes, Stock 1=51358973, Supplier 1=Digi-Key, Termination=SMD/SMT, Width=0.02inch, Working Voltage=50V
R40 R81: library part Resistor, "RES SMD 4.99 OHM 1% 1/16W 0402", Case Code (Imperial)=0402, Case Code (Metric)=1005, Manufacturer=Vishay, Manufacturer Part Number=CRCW04024R99FKEDC, Max Operating Temperature=155°C, Max Power Dissipation=63mW, Min Operating Temperature=-55°C, Supplier Part Number 1=541-4085-1-ND, Temperature Coefficient=100ppm/°C, Tolerance=1%, Case/Package=0402, ComponentLink1Description=http://www.vishay.com/docs/28773/crcwce3.pdf?src-supplier=Digi-Key, ComponentLink1URL=http://www.vishay.com/docs/28773/crcwce3.pdf?src-supplier=Digi-Key, Composition="Thick Film", Number of Terminations=2, Packaging="Tape and Reel", Pricing 1="1=0,10000, 10=0,09300, 100=0,03580, 1000=0,01573, 2500=0,01358, 5000=0,01216 (USD)", Resistance=4.99R, RoHS=No, Stock 1=341364, Supplier 1=Digi-Key
R41 R79 R84 R97: library part Resistor, Case Code (Imperial)=0402, Case Code (Metric)=1005, Manufacturer 1=Susumu, Manufacturer Part Number 1=RR0510R-510-D, Max Operating Temperature=125°C, Max Power Dissipation=63mW, Min Operating Temperature=-55°C, Package Quantity=1, Supplier Part Number 1=RR05R51DCT-ND, Temperature Coefficient=100ppm/°C, Tolerance=0.5%, Voltage Rating=25V, Case/Package=0402, ComponentLink1Description=https://datasheet.ciiva.com/2486/rr-data-sheet-2486920.pdf?src-supplier=Digi-Key, ComponentLink1URL=https://datasheet.ciiva.com/2486/rr-data-sheet-2486920.pdf?src-supplier=Digi-Key, ComponentLink2Description=https://datasheet.ciiva.com/2486/rr-data-sheet-2486921.pdf?src-supplier=Digi-Key, ComponentLink2URL=https://datasheet.ciiva.com/2486/rr-data-sheet-2486921.pdf?src-supplier=Digi-Key, ComponentLink3Description=https://datasheet.ciiva.com/2486/rr-data-sheet-2486922.pdf?src-supplier=Digi-Key, ComponentLink3URL=https://datasheet.ciiva.com/2486/rr-data-sheet-2486922.pdf?src-supplier=Digi-Key, ComponentLink4Description=https://datasheet.ciiva.com/28635/87330-28635919.pdf?src-supplier=Element14, ComponentLink4URL=https://datasheet.ciiva.com/28635/87330-28635919.pdf?src-supplier=Element14, Composition="Thin Film", Height=0.016inch, Lead Free="Lead Free", Length=0.039inch, Number of Pins=2, Number of Terminations=2, Packaging="Tape and Reel", Power Rating=63mW, Pricing 1="1=0.10000, 10=0.07400, 100=0.02850, 1000=0.01254, 2500=0.01083, 5000=0.00969 (USD)", REACH SVHC=Unknown, Resistance=51R, RoHS=Yes, Stock 1=85168, Supplier 1=Digi-Key, Termination=SMD/SMT, Voltage Rating (DC)=25V, Width=0.02inch